# Altium PCB 48V-12V20A.PcbDoc (part 2 of 2)
Units mm, origin at the board's own origin, x right, y up, seen from the top; angles counter-clockwise.
Board outline 100 x 60 mm, 4 copper layers (Top Layer, GND02, POWER, Bottom Layer), stack 0.742 mm thick; 87 components, 43 nets, 281 pads, 430 vias.
Unrouted connection lines stored in the file: 18.
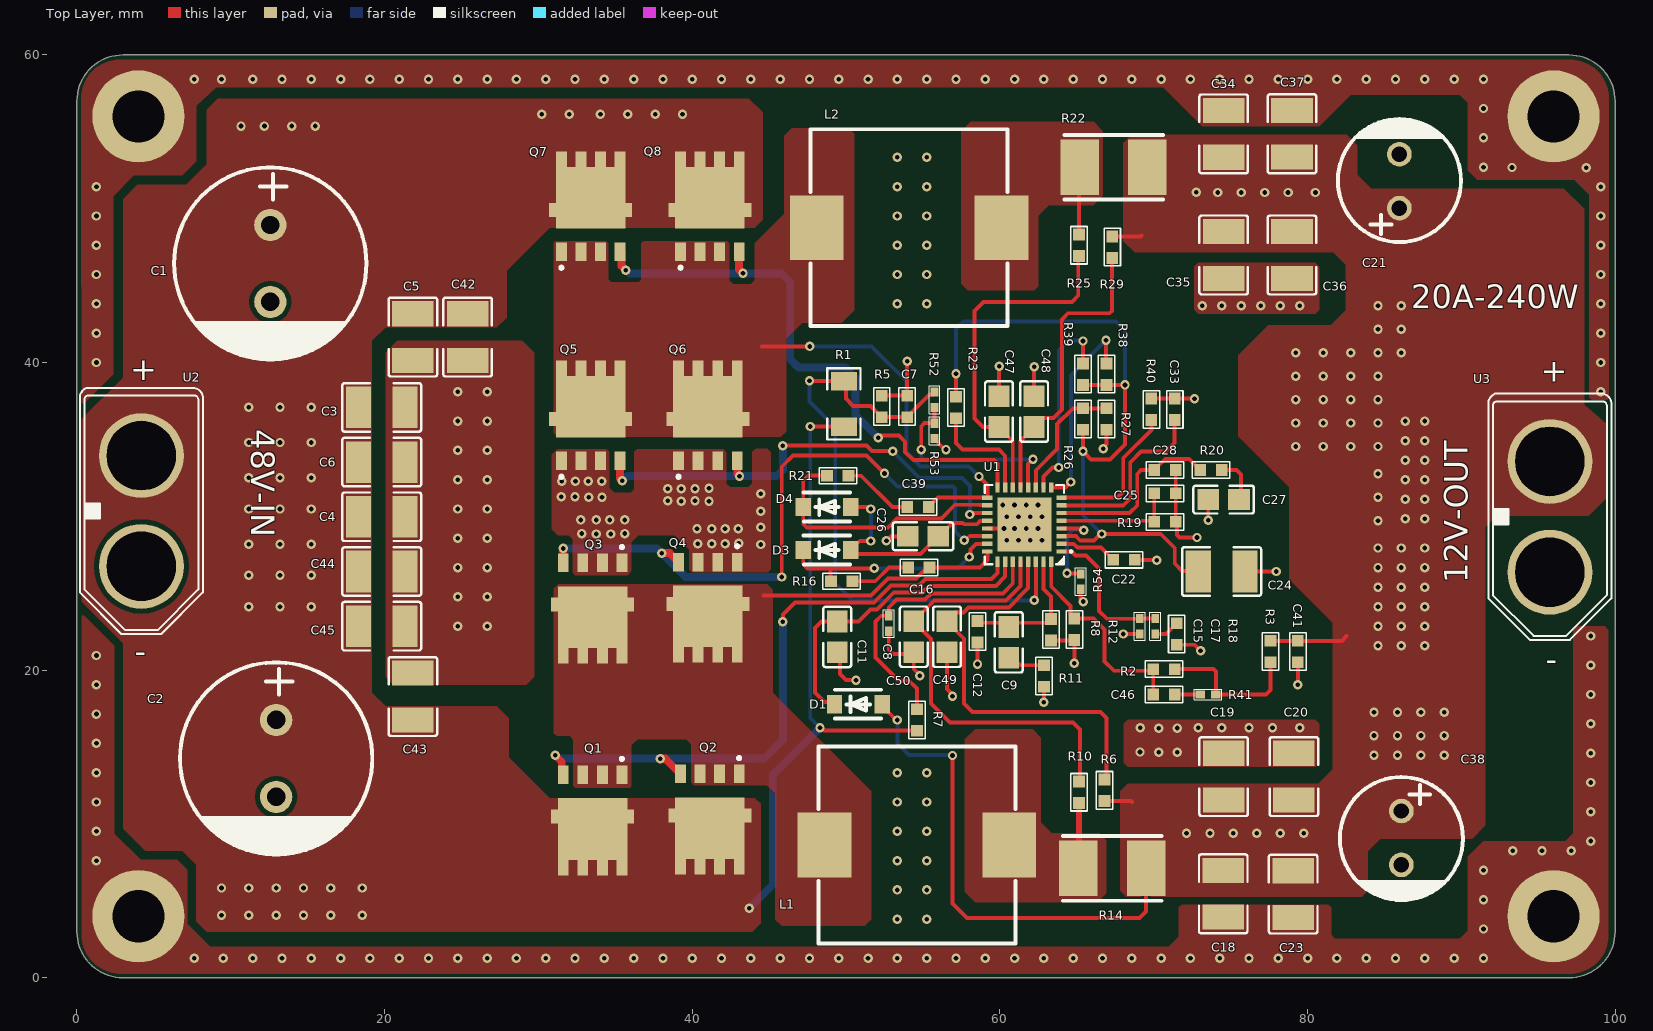
[diagram p0: Top Layer view]

## Via types
v1: diameter 0.61, hole 0.305, Top Layer to Bottom Layer, tented both sides, 430 vias

## Nets (pads, with @x,y where several pads share a name; then routed paths per layer and width w, separated by ;. In a path a pad name is that pad's centre, name@x,y a point inside that pad or via, vN(x,y) a via of type N, cw(c..) or ccw(c..) an arc to the next point about the centre after c; other vN are vias at no path point) (continued)
NetC39_1: C39.1 L2.1 Q5.5 Q5.6 Q5.7 Q5.8 Q5.9 Q5.10 Q5.11 Q6.5 Q6.6 Q6.7 Q6.8 Q6.9 Q6.10 Q6.11 Q7.1 Q7.2 Q7.3 Q8.1 Q8.2 Q8.3 U1.17 | length 26
  Top Layer w0.254: 44.526,41.046 v1(47.65,41.046) ; C39.1 55.979,31.214 U1.17 59.187,32.05 v1(58.649,32.588)
  Bottom Layer w0.254: v1(47.65,41.046) 51.664,41.046 53.924,38.786 53.924,34.173 54.849,33.249 57.988,33.249 v1(58.649,32.588)
NetC39_2: C39.2 R21.1 | length 4.7
  Top Layer w0.254: R21.1 50.978,32.639 53.01,30.607 C39.2
NetC46_1: C46.1 R2.1 R12.2 U1.32 | length 13.8
  Top Layer w0.254: U1.32 63.345,25.428 64.592,24.181 64.592,23.609 R12.2 66.103,23.355 66.802,22.657 66.802,20.574 67.412,19.964 69.875,19.964 R2.1 C46.1
NetC46_2: C46.2 R41.1 | length 1.7
  Top Layer w0.254: C46.2 R41.1
NetC47_2: C47.2 R25.1 U1.14 | length 22.9
  Top Layer w0.254: U1.14 60.843,34.885 59.944,35.784 C47.2 58.903,35.814 58.344,36.373 58.344,43.358 58.928,43.942 64.694,43.942 65.1,44.348 65.1,46.876 R25.1
NetC48_2: C48.2 R29.1 U1.13 | length 19.5
  Top Layer w0.254: U1.13 61.344,34.898 62.23,35.784 C48.2 62.23,35.844 62.778,36.392 63.482,36.392 64.033,36.943 64.033,42.799 64.44,43.205 67.136,43.205 67.285,43.354 R29.1@67.285,46.934
NetC49_1: C49.1 R6.2 U1.29 | length 27.5
  Top Layer w0.254: U1.29 61.844,25.333 60.591,24.079 57.966,24.079 57.639,23.752 57.114,23.752 56.566,23.204 C49.1 56.566,23.144 57.665,22.045 57.665,17.823 58.217,17.272 66.548,17.272 66.929,16.891 R6.2@66.929,12.802
NetC50_1: C50.1 R10.2 U1.28 | length 29.1
  Top Layer w0.254: U1.28 61.344,25.479 60.401,24.536 55.739,24.536 54.407,23.204 54.407,23.144 55.519,22.032 55.519,17.836 56.769,16.586 64.77,16.586 65.202,16.154 65.202,12.814 R10.2
NetD3_1: D3.1 R16.1 U1.23 | length 14.8
  Top Layer w0.254: D3.1 47.218,26.899 47.498,26.619 48.997,26.619 ; R16.1 48.997,25.806 48.997,26.619 ; v1(51.841,26.619) 48.997,26.619 ; v1(58.014,27.356) 58.082,27.424 58.082,27.856 58.44,28.214 U1.23
  Bottom Layer w0.254: v1(51.841,26.619) 57.277,26.619 v1(58.014,27.356)
NetD4_1: D4.1 R21.2 U1.18 | length 17.2
  Top Layer w0.254: R21.2 48.743,32.664 47.549,32.664 47.218,32.334 D4.1 47.218,29.515 47.447,29.286 52.744,29.286 53.328,29.87 56.21,29.87 57.097,30.757 58.705,30.757 58.718,30.744 58.864,30.744 58.882,30.726 59.174,30.726 U1.18
NetL1_2: L1.2 R10.1 R14.1 | length 4.3
  Top Layer w0.381: R14.1 65.151,7.153 R10.1
NetL2_2: L2.2 R22.1 R25.2 | length 4.4
  Top Layer w0.254: R25.2 R22.1@65.151,52.66
  Top Layer w0.381: R22.1@65.151,52.66 R22.1
NetQ1_4: Q1.4 Q2.4 U1.25 | length 42.8
  Top Layer w0.254: v1(45.898,23.139) 45.898,23.622 46.685,24.409 51.823,24.409 52.915,25.502 54.746,25.502 55.177,25.933 59.461,25.933 59.845,26.317 U1.25
  Top Layer w0.508: v1(31.09,14.478) 31.526,14.041 31.526,13.193 Q1.4@31.623,13.096 ; v1(37.922,14.249) 38.257,14.249 39.243,13.264 Q2.4@39.243,13.152
  Bottom Layer w0.508: v1(31.09,14.478) 31.117,14.478 31.346,14.249 v1(37.922,14.249) 44.679,14.249 45.898,15.469 v1(45.898,23.139)
NetQ3_4: Q3.4 Q4.4 U1.22 | length 42.3
  Top Layer w0.254: v1(45.822,26.06) 45.822,33.223 46.558,33.96 51.333,33.96 v1(52.502,32.791) ; v1(57.683,28.448) 57.78,28.448 58.046,28.715 U1.22
  Top Layer w0.508: Q3.4@31.623,26.868 v1(31.623,27.915) ; v1(38.024,27.61) 38.542,27.61 39.116,27.036 Q4.4@39.116,26.924
  Bottom Layer w0.254: v1(52.502,32.791) 53.34,31.953 56.947,31.953 57.099,31.801 57.099,29.032 v1(57.683,28.448)
  Bottom Layer w0.508: v1(31.623,27.915) 37.692,27.915 37.996,27.61 v1(38.024,27.61) 39.573,26.06 v1(45.822,26.06)
NetQ5_4: Q5.4 Q6.4 U1.19 | length 31.2
  Top Layer w0.254: v1(45.898,34.595) 51.345,34.595 51.701,34.239 v1(53.035,34.239) ; v1(58.054,30.122) 58.15,30.122 58.244,30.216 U1.19
  Top Layer w0.508: Q5.4@35.306,33.711 35.306,32.461 v1(35.458,32.309) ; Q6.4@42.926,33.711 42.926,32.766 v1(43.078,32.614)
  Bottom Layer w0.254: v1(53.035,34.239) 54.788,32.487 57.531,32.487 58.054,31.963 v1(58.054,30.122)
  Bottom Layer w0.508: v1(35.458,32.309) 35.486,32.309 35.791,32.614 v1(43.078,32.614) 45.491,32.614 45.898,33.02 v1(45.898,34.595)
NetQ7_4: Q7.4 Q8.4 U1.16 | length 38.9
  Top Layer w0.254: v1(52.095,35.103) 52.248,35.255 53.442,35.255 53.848,34.849 53.848,34.188 54.381,33.655 59.639,33.655 59.845,33.449 U1.16
  Top Layer w0.508: Q7.4@35.306,47.3 35.403,47.203 35.403,46.284 v1(35.687,45.999) ; Q8.4@43.053,47.3 43.053,46.05 v1(43.307,45.796)
  Bottom Layer w0.508: v1(35.687,45.999) 35.714,45.999 35.918,45.796 v1(43.307,45.796) 45.796,45.796 46.38,45.212 46.38,40.208 46.914,39.675 49.962,39.675 50.622,39.014 50.622,36.576 v1(52.095,35.103)
NetR2_2: R2.2 R3.1 R41.2 | length 9.7
  Top Layer w0.254: R2.2 73.889,20.066 74.041,19.914 74.041,18.423 R41.2 77.292,18.415 77.597,18.72 R3.1
NetR23_1: R23.1 U1.15 | length 7.2
  Top Layer w0.254: R23.1 57.15,34.773 57.582,34.341 59.944,34.341 60.345,33.939 U1.15
NetR26_2: R26.2 R27.1 U1.11 | length 8.3
  Top Layer w0.254: U1.11 62.344,32.998 63.729,34.383 63.729,35.992 64.757,37.021 R26.2 R27.1
NetR38_2: R38.2 U1.9 | length 13.1
  Top Layer w0.254: U1.9 64.257,31.872 v1(64.618,32.233) ; v1(66.904,41.453) 66.904,39.967 R38.2
  Bottom Layer w0.254: v1(64.618,32.233) 64.618,39.167 v1(66.904,41.453)
NetR39_2: R39.2 U1.10 | length 12.9
  Top Layer w0.254: U1.10 62.845,32.593 63.424,33.172 v1(63.83,33.172) ; R39.2 v1(65.405,41.402)
  Bottom Layer w0.254: v1(63.83,33.172) 63.83,40.818 64.44,41.427 65.379,41.427 v1(65.405,41.402)
NetR40_2: R40.2 U1.8 | length 9.6
  Top Layer w0.254: U1.8 67.663,31.214 68.021,31.572 68.021,33.782 69.85,35.611 R40.2
NetR54_2: R54.2 U1.4 | length 6.1
  Top Layer w0.254: U1.4 64.209,29.21 64.209,29.215 65.25,29.215 65.36,29.106 v1(65.456,29.106) ; v1(64.367,26.307) 64.393,26.281 65.227,26.281 R54.2
  Bottom Layer w0.254: v1(64.367,26.307) 64.367,28.731 64.77,29.134 65.428,29.134 v1(65.456,29.106)
VCC5: C24.2 R23.2 R26.1 R38.1 R39.1 U1.3 | length 47.4
  Top Layer w0.254: R23.2 v1(57.15,39.268) ; U1.3 64.951,28.715 64.995,28.672 65.226,28.44 66.113,28.44 66.528,28.854 v1(66.624,28.854) 70.46,28.854 71.374,27.94 71.374,26.924 71.855,26.443 72.877,26.443 C24.2 ; R26.1 v1(65.405,34.239) 65.938,33.706 67.158,33.706 68.136,34.684 v1(68.136,38.545) R38.1 R39.1
  Bottom Layer w0.254: v1(57.15,39.268) 57.15,42.189 57.633,42.672 67.564,42.672 68.136,42.1 v1(68.136,38.545) ; v1(65.405,34.239) 65.405,30.074 v1(66.624,28.854)

## Polygon pours and split planes (outlines as drawn)
GND on Bottom Layer "GND_L04_P043" (solid, pour order 43): 0,3 0,57 cw(c3,57) 3,60 97,60 cw(c97,57) 100,57 100,3 cw(c97,3) 97,0 3,0 cw(c3,3)
12V on Top Layer "12V_L01_P040" (solid, pour order 40): 96.647,51.283 97.983,50 97.983,37.27 99.416,36.012 99.416,31.191 98.273,30.048 92.304,30.048 91.516,29.261 91.567,29.21 91.567,9.906 90.703,9.042 84.734,9.042 83.922,8.23 83.922,5.664 83.541,5.283 68.224,5.283 67.843,5.664 67.843,12.141 68.326,12.624 80.696,12.624 81.636,13.564 81.636,23.089 78.816,25.908 78.816,31.877 75.489,35.204 75.489,40.462 77.445,42.418 81.509,42.418 82.474,43.383 82.474,46.355 81.661,47.168 68.758,47.168 68.032,47.894 68.032,54.276 68.047,54.28 68.58,54.813 82.55,54.813 83.236,54.127 83.236,52.197 84.15,51.283
GND on Top Layer "Top Layer-GND" (solid, pour order 81): 99.593,37.704 99.48,37.567 98.486,37.567 98.323,37.71 98.323,50.902 97.333,51.892 91.034,51.892 90.424,52.502 90.424,56.896 89.916,57.404 82.804,57.404 80.772,55.372 73.152,55.372 70.612,57.912 9.059,57.912 7.772,56.706 7.772,53.086 6.858,52.172 3.708,52.172 2.362,50.825 2.362,39.243 0.327,37.208 0.279,52.451 0.279,57.15 cw(c2.819,57.15) 2.819,59.69 97.053,59.69 cw(c97.053,57.15) 99.593,57.15
GND on Top Layer "Top Layer-GND 1" (solid, pour order 75): 97.028,0.254 ccw(c97.028,2.794) 99.568,2.794 99.568,22.606 99.314,22.86 97.536,22.86 97.282,22.606 97.282,9.398 96.774,8.89 91.44,8.89 90.424,7.874 90.424,3.048 89.916,2.54 81.788,2.54 81.534,2.794 81.534,4.572 81.28,4.826 71.882,4.826 71.628,4.572 71.628,2.667 70.993,2.032 8.661,2.032 7.188,3.505 7.188,7.01 6.528,7.671 4.14,7.671 2.438,9.373 2.438,21.59 0.33,23.698 0.33,22.86 0.33,2.794 ccw(c2.87,2.794) 2.87,0.254 7.112,0.254
GND on Top Layer "GND_L01_P048" (solid, pour order 48): 68.072,16.51 68.326,16.764 80.518,16.764 80.772,16.51 80.772,13.97 80.518,13.716 68.326,13.716 68.072,13.97
NetL2_2 on Top Layer "NETL2_2_L01_P010" (solid, pour order 10): 57.48,55.016 58.115,55.651 66.091,55.651 66.7,55.042 66.7,50.851 66.065,50.216 63.17,50.216 62.484,49.53 62.484,44.958 62.23,44.704 57.912,44.704 57.48,45.136
GND on Top Layer "GND_L01_P057" (solid, pour order 57): 20.066,40.64 20.828,41.402 28.956,41.402 29.718,40.64 29.718,19.558 29.21,19.05 20.574,19.05 20.066,19.558
48V on Top Layer "Top Layer-48V" (solid, pour order 56): 3,9.7 4.445,8.255 6.858,8.255 7.747,7.366 7.747,3.683 8.43,3 43.894,3 44.45,3.556 44.45,11.303 44.069,11.684 30.734,11.684 28.067,14.351 28.067,16.891 27.305,17.653 20.066,17.653 19.177,18.542 19.177,41.402 20.066,42.291 27.305,42.291 27.94,42.926 27.94,45.974 30.734,48.768 44.069,48.768 44.577,49.276 44.577,56.261 43.688,57.15 9.144,57.15 8.433,56.439 8.433,52.883 7.112,51.562 3.937,51.562 3,50.625 3,39.014 0.33,36.345 0.33,24.435 3,21.765
GND on Top Layer "GND_L01_P050" (solid, pour order 50): 72.644,46.228 72.898,46.482 80.518,46.482 80.772,46.228 80.772,43.434 80.518,43.18 72.898,43.18 72.644,43.434
NetC16_2 on Top Layer "NETC16_2_L01_P009" (solid, pour order 9): 31.013,25.298 31.293,25.578 44.882,25.578 45.237,25.222 45.237,18.517 50.749,13.005 51.638,12.116 51.638,3.81 51.206,3.378 45.822,3.378 45.415,3.785 45.415,11.963 44.856,12.522 40.107,12.522 39.929,12.7 39.929,15.189 39.599,15.519 36.449,15.519 36.043,15.113 36.043,12.446 35.941,12.344 32.41,12.344 32.283,12.471 32.283,15.469 32.029,15.723 31.191,15.723 31.013,15.9
GND on Top Layer "GND_L01_P008" (solid, pour order 8): 31.242,34.366 34.417,34.366 34.595,34.188 34.595,31.852 34.925,31.521 36.017,31.521 36.246,31.75 36.246,34.214 36.398,34.366 42.012,34.366 42.215,34.163 42.215,32.131 42.469,31.877 43.637,31.877 43.917,32.156 43.917,34.188 44.12,34.392 44.882,34.392 45.11,34.163 45.11,26.549 44.927,26.365 39.98,26.365 39.802,26.543 39.802,27.838 38.862,28.778 36.5,28.778 36.043,28.321 36.043,26.416 35.814,26.187 32.41,26.187 32.233,26.365 32.233,28.524 31.979,28.778 31.267,28.778 30.886,29.159 30.886,34.011
NetC39_1 on Top Layer "Top Layer-NetC39_1" (solid, pour order 38): 30.988,35.433 31.242,35.179 45.771,35.179 46.101,35.509 46.101,41.567 46.139,41.567 47.168,42.596 49.733,42.596 50.546,43.409 50.546,50.038 49.022,48.514 46.99,48.514 49.022,48.514 50.546,50.038 50.546,54.864 50.165,55.245 46.482,55.245 45.974,54.737 45.974,49.657 44.069,47.752 44.069,45.339 43.815,45.085 42.672,45.085 42.418,45.339 42.418,47.752 42.291,47.879 36.83,47.879 36.703,47.752 36.703,45.39 36.525,45.212 34.747,45.212 34.544,45.415 34.544,47.752 34.417,47.879 31.09,47.879 30.988,47.777
NetL1_2 on Top Layer "NETL1_2_L01_P011" (solid, pour order 11): 66.929,5.486 66.37,4.928 58.395,4.928 57.734,5.588 57.734,15.494 58.395,16.154 62.128,16.154 62.662,15.621 62.662,10.109 63.373,9.398 66.472,9.398 66.929,8.941
48V on POWER (split plane): 3,59.49 45.401,59.49 45.401,49.154 40.762,44.515 30.734,44.515 30.672,44.509 30.612,44.491 30.557,44.461 30.508,44.422 26.792,40.705 22.098,40.705 22.036,40.699 21.976,40.681 21.921,40.651 21.872,40.612 19.332,38.072 19.293,38.023 19.263,37.968 19.245,37.908 19.239,37.846 19.239,20.828 19.245,20.766 19.263,20.706 19.293,20.651 19.332,20.602 22.38,17.554 22.429,17.515 22.484,17.485 22.544,17.467 22.606,17.461 41.016,17.461 44.639,13.838 44.639,0.51 3,0.51 2.984,0.509 2.783,0.518 2.567,0.546 2.355,0.593 2.148,0.658 1.947,0.742 1.754,0.842 1.571,0.959 1.398,1.091 1.238,1.238 1.091,1.398 0.959,1.571 0.842,1.754 0.742,1.947 0.658,2.148 0.593,2.355 0.546,2.567 0.518,2.783 0.509,2.984 0.51,3 0.51,57 0.509,57.016 0.518,57.217 0.546,57.433 0.593,57.645 0.658,57.852 0.742,58.053 0.842,58.246 0.959,58.429 1.091,58.602 1.238,58.762 1.398,58.909 1.571,59.041 1.754,59.158 1.947,59.258 2.148,59.342 2.355,59.407 2.567,59.454 2.783,59.482 2.984,59.491
12V on POWER (split plane): 97.217,59.482 97.433,59.454 97.645,59.407 97.852,59.342 98.053,59.258 98.246,59.158 98.429,59.041 98.602,58.909 98.762,58.762 98.909,58.602 99.041,58.429 99.158,58.246 99.258,58.053 99.342,57.852 99.407,57.645 99.454,57.433 99.482,57.217 99.491,57.016 99.49,57 99.49,3 99.491,2.984 99.482,2.783 99.454,2.567 99.407,2.355 99.342,2.148 99.258,1.947 99.158,1.754 99.041,1.571 98.909,1.398 98.762,1.238 98.602,1.091 98.429,0.959 98.246,0.842 98.053,0.742 97.852,0.658 97.645,0.593 97.433,0.546 97.217,0.518 97.016,0.509 97,0.51 45.277,0.51 45.277,13.97 45.271,14.032 45.253,14.092 45.223,14.147 45.184,14.196 41.374,18.006 41.325,18.045 41.27,18.075 41.21,18.093 41.148,18.099 22.738,18.099 19.877,20.96 19.877,37.714 22.23,40.067 26.924,40.067 26.986,40.073 27.046,40.091 27.101,40.121 27.15,40.16 30.866,43.877 40.894,43.877 40.956,43.883 41.016,43.901 41.071,43.931 41.12,43.97 45.946,48.796 45.985,48.845 46.015,48.9 46.033,48.96 46.039,49.022 46.039,59.49 97,59.49 97.016,59.491
GND on GND02 (split plane): 97.217,59.482 97.433,59.454 97.645,59.407 97.852,59.342 98.053,59.258 98.246,59.158 98.429,59.041 98.602,58.909 98.762,58.762 98.909,58.602 99.041,58.429 99.158,58.246 99.258,58.053 99.342,57.852 99.407,57.645 99.454,57.433 99.482,57.217 99.491,57.016 99.49,57 99.49,3 99.491,2.984 99.482,2.783 99.454,2.567 99.407,2.355 99.342,2.148 99.258,1.947 99.158,1.754 99.041,1.571 98.909,1.398 98.762,1.238 98.602,1.091 98.429,0.959 98.246,0.842 98.053,0.742 97.852,0.658 97.645,0.593 97.433,0.546 97.217,0.518 97.016,0.509 97,0.51 3,0.51 2.984,0.509 2.783,0.518 2.567,0.546 2.355,0.593 2.148,0.658 1.947,0.742 1.754,0.842 1.571,0.959 1.398,1.091 1.238,1.238 1.091,1.398 0.959,1.571 0.842,1.754 0.742,1.947 0.658,2.148 0.593,2.355 0.546,2.567 0.518,2.783 0.509,2.984 0.51,3 0.51,57 0.509,57.016 0.518,57.217 0.546,57.433 0.593,57.645 0.658,57.852 0.742,58.053 0.842,58.246 0.959,58.429 1.091,58.602 1.238,58.762 1.398,58.909 1.571,59.041 1.754,59.158 1.947,59.258 2.148,59.342 2.355,59.407 2.567,59.454 2.783,59.482 2.984,59.491 3,59.49 97,59.49 97.016,59.491

## Other copper
POWER (plane layer: these items are gaps in the copper):
  lines w0.635: 44.958,0.254 44.958,13.97 41.148,17.78 22.606,17.78 19.558,20.828 19.558,37.846 22.098,40.386 26.924,40.386 30.734,44.196 40.894,44.196 45.72,49.022 45.72,59.944

## Silkscreen, mask and mechanical layers (free items; w line width, h text height)
Top Overlay:
  text "20A-240W" at 86.741,43.536 h1.52
  text "+" at 3.454,38.837 h1.52
  text "+" at 95.174,38.735 h1.52
  text "48V-IN" at 11.328,35.662 h1.52 r270
  text "12V-OUT" at 90.424,25.654 h1.52 r90
  text "-" at 3.759,20.473 h1.52
  text "-" at 95.504,19.965 h1.52
Mechanical 1:
  the board outline again, w0.254